# Altium PCB MFG01_04.PcbDoc
Units mm, origin at the board's own origin, x right, y up, seen from the top; angles counter-clockwise.
Board outline 80 x 50 mm, 2 copper layers (TopLayer, BottomLayer); 61 components, 44 nets, 259 pads, 60 vias.
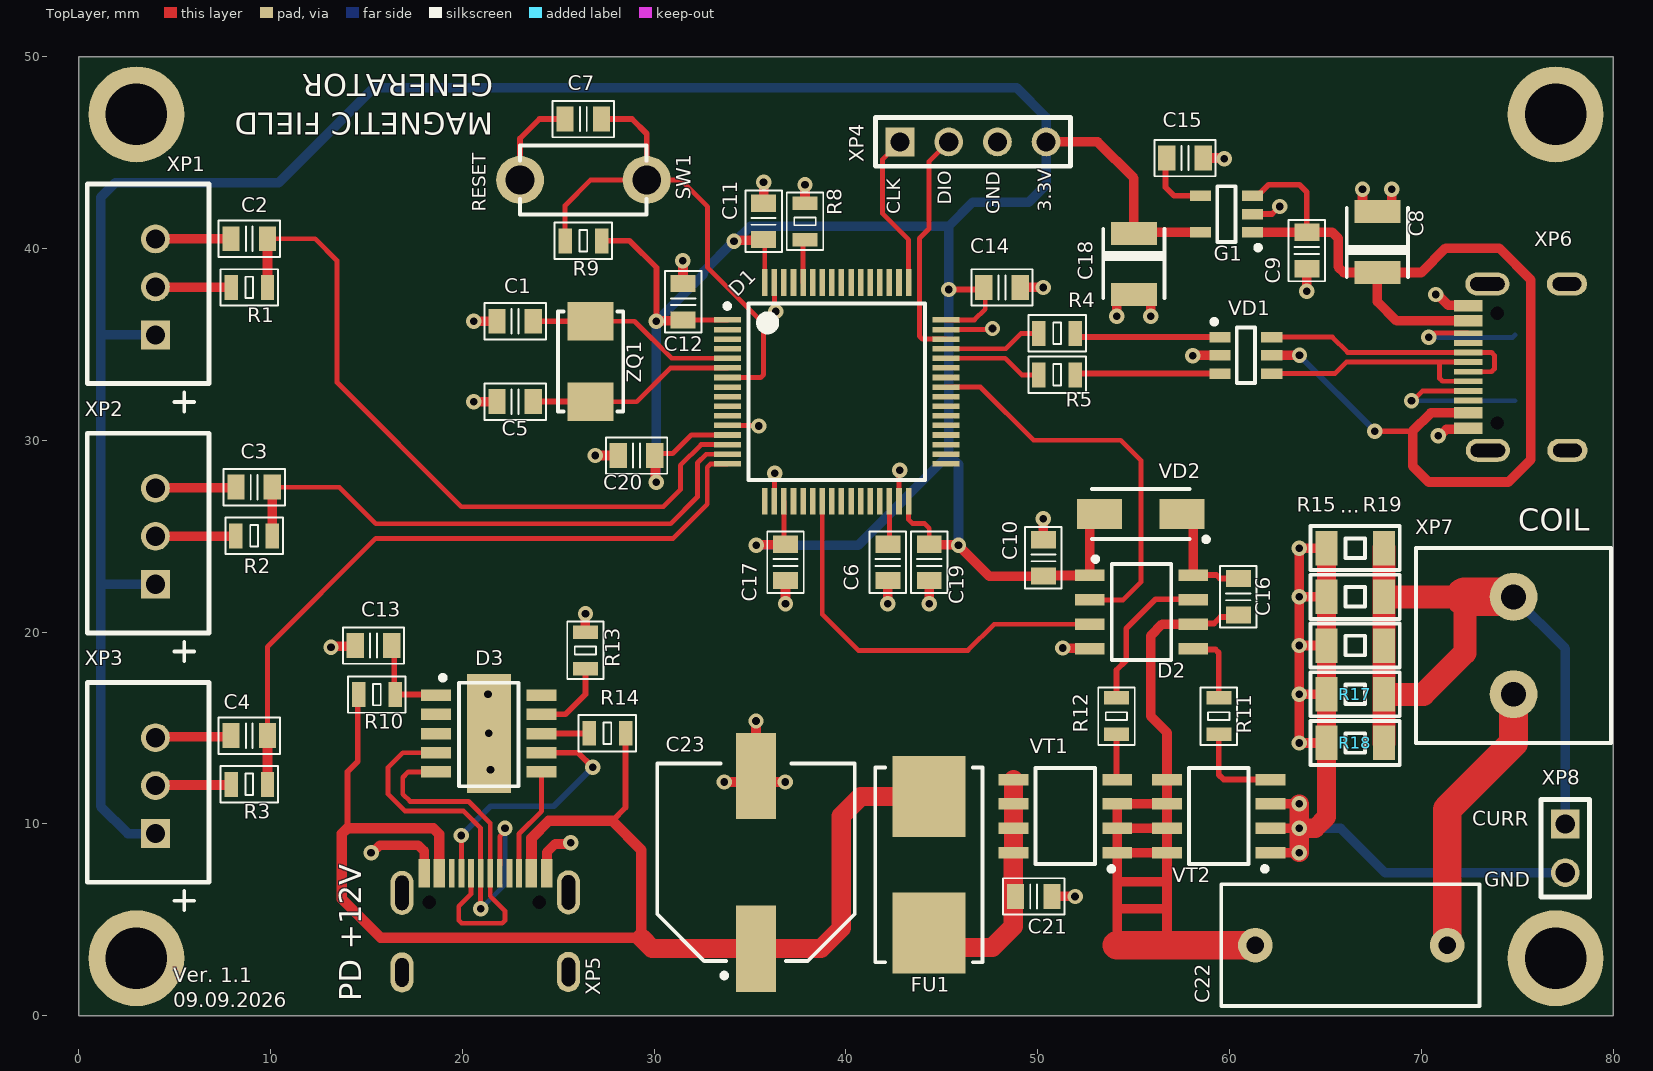
[diagram p0: TopLayer view]
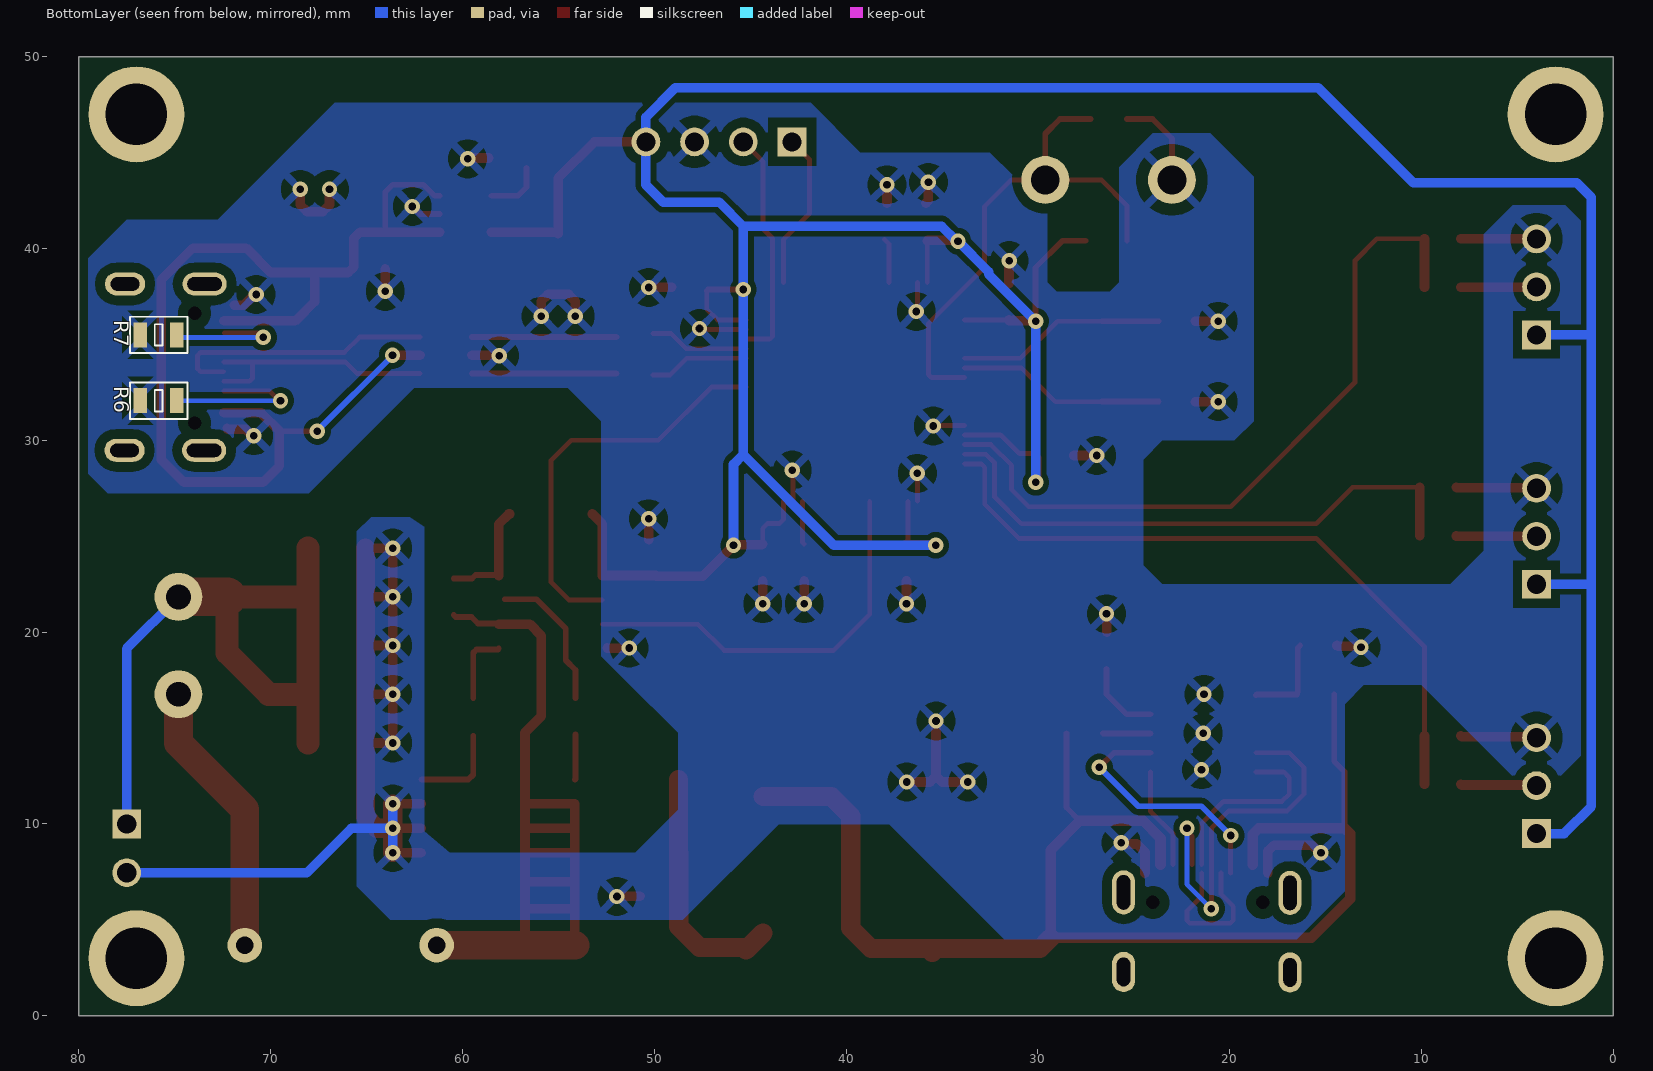
[diagram p1: BottomLayer view, seen from below]
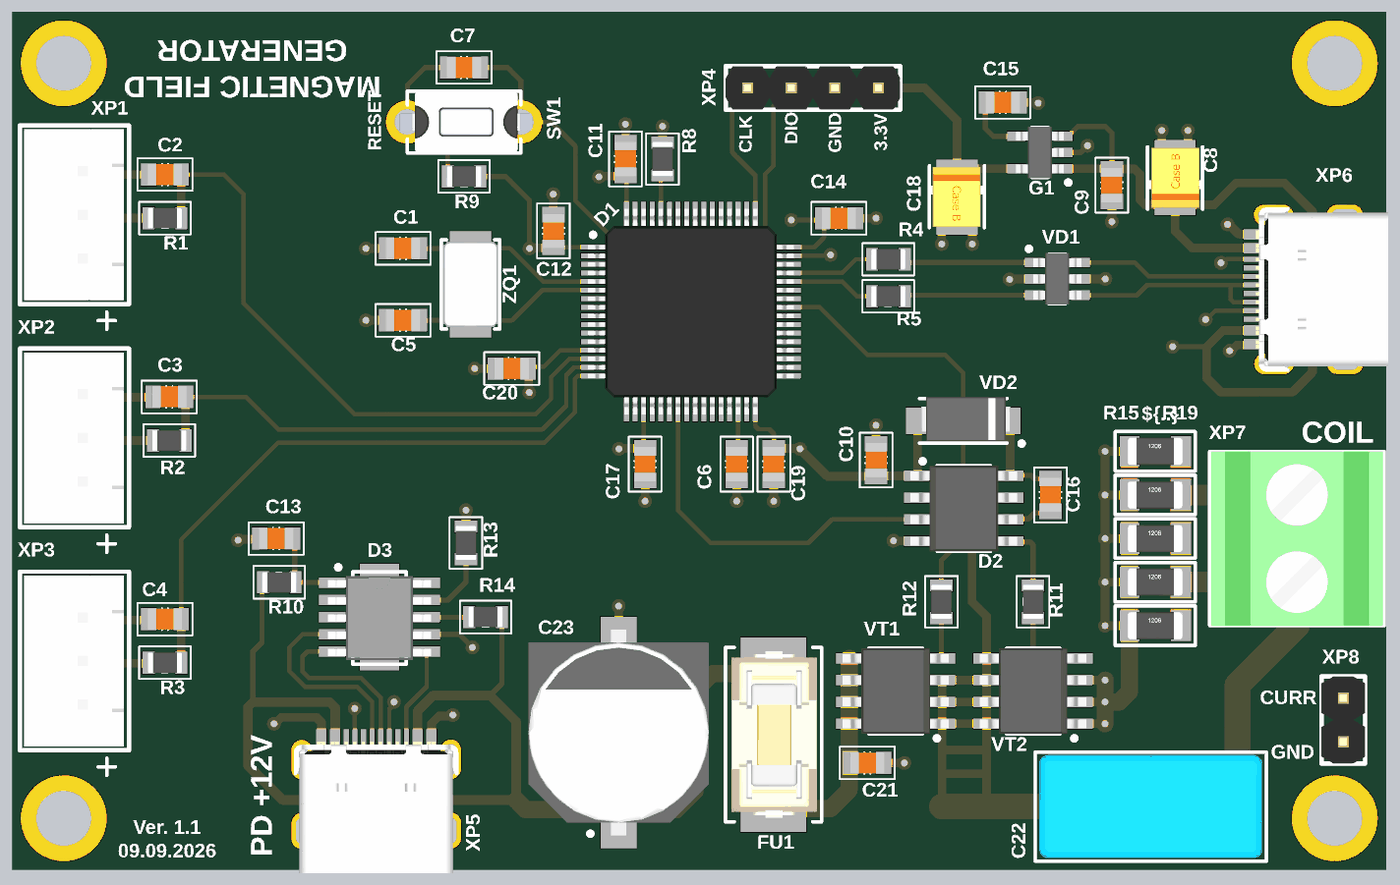
[diagram p2: 3D render of the assembled board from above, using the file's embedded part models]

## Layer stack, top to bottom
TopSolder: solder mask 0.0102, Solder Resist, Dk 3.5
TopLayer: signal copper 0.0356
Dielectric1: core 0.32, FR-4, Dk 4.8
BottomLayer: signal copper 0.0356
BottomSolder: solder mask 0.0102, Solder Resist, Dk 3.5

## Board outline
0,0 0,50 80,50 80,0

## Design rules (kind name [scope] priority, off if disabled: settings)
Clearance [All] p1: gap=0.2 ignorepadtopadclearanceinfootprint=FALSE except(0.254: Arc-Arc Arc-Track; 0.3: Arc-Poly Track-Poly SMDPad-Poly Via-Poly Fill-Poly Poly-Poly; 0.5: THPad-Fill THPad-Poly)
FabricationTestPointUsage TestPointUsage [All] p1: valid=0 allowmultiple=FALSE
FabricationTestpoint Testpoint [All] p1: side=3 testpointundercomponent=TRUE minsize=1.016 maxsize=2.54 preferedsize=1.524 minholesize=0.508 maxholesize=1.016 preferedholesize=0.813 testpointgrid=0.025 allowsidetop=TRUE allowsidebottom=TRUE usegrid=TRUE gridtolerance=0
PlaneClearance [All] p1: clearance=0.6
PlaneConnect [All] p1: planeconnectstyle=Relief reliefexpansion=0.4 reliefentries=4 reliefconductorwidth=0.4 reliefairgap=0.6
PolygonConnect [All] p1: connectstyle=Relief reliefconductorwidth=0.4 reliefentries=4 polygonreliefangle="45 Angle" airgapwidth=0.6
RoutingLayers NO_GND_TRACE [InNet('GND')] p1: top layer_v5=FALSE bottom layer_v5=FALSE
RoutingLayers [All] p2: top layer_v5=TRUE bottom layer_v5=TRUE
RoutingPriority RoutingPriority_3 [InNet('GND')] p1: routingpriority=1
RoutingPriority RoutingPriority_2 [InNet('VCC')] p2: routingpriority=1
RoutingPriority RoutingPriority_1 [InNet('-15V')] p3: routingpriority=1
RoutingPriority [InNet('+15V')] p4: routingpriority=1
RoutingVias [All] p1: holewidth=0.4 width=0.8 viastyle="Through Hole" minholewidth=0.4 minwidth=0.8 maxholewidth=0.4 maxwidth=0.8
SMDNeckDown [All] p1: percent=90.000
SilkToSolderMaskClearance SilkscreenOverComponentPads [IsPad] p1: minsilkscreentomaskgap=0.254 clearancetoexposedcopper=TRUE
SolderMaskExpansion [All] p1: expansion=0.051 istentingtop=FALSE
Width Width_4 [InNet('NetC21_1')] p1: maxlimit=1 minlimit=0.3 preferedwidth=0.8
Width Width_3 [InNet('NetR15_2')] p2: maxlimit=1.5 minlimit=0.5 preferedwidth=1
Width Width_2 [InNet('NetC22_2')] p3: maxlimit=2 minlimit=0.5 preferedwidth=1
Width Width_1 [InNet('NetC16_2')] p4: maxlimit=2 minlimit=0.3 preferedwidth=1
Width VP [InNet('12V')] p5: maxlimit=1 minlimit=0.3 preferedwidth=0.8
Width PEL2 [InNet('PEL2')] p6: maxlimit=1 minlimit=0.3 preferedwidth=0.8
Width PEL1 [InNet('PEL1')] p7: maxlimit=1 minlimit=0.3 preferedwidth=0.8
Width GND [InNet('GND')] p8: maxlimit=1 minlimit=0.254 preferedwidth=0.5
Width VCC [InNet('5V')] p9: maxlimit=0.8 minlimit=0.3 preferedwidth=0.8
Width [All] p10: maxlimit=0.5 minlimit=0.254 preferedwidth=0.3
23 further rules are at their usual default settings.

## Components (designator, comment, footprint, x,y, rotation, side; value= is the part's Value field where it differs from the comment)
... "?" R_1206 66.548,19.304 r0 top (schematic designator R16)
C1 "20pF" C_0805 22.749,36.212 r180 top
C2 "100" C_0805 8.89,40.513 r180 top
C3 "100" C_0805 9.144,27.559 r180 top
C4 "100" C_0805 8.89,14.605 r180 top
C5 "20pF" C_0805 22.749,32.021 r180 top
C6 "?" C_0805 42.18,23.639 r270 top
C7 "?" C_0805 26.305,46.753 r180 top
C8 "?" "Tantalum B" 67.707,38.752 r90 top
C9 "?" C_0805 64.024,39.895 r270 top
C10 "?" C_0805 50.292,23.876 r90 top
C11 "?" C_0805 35.703,41.419 r90 top
C12 "?" C_0805 31.512,37.228 r90 top
C13 "?" C_0805 15.367,19.304 r0 top
C14 "?" C_0805 48.133,37.973 r0 top
C15 "?" C_0805 57.674,44.721 r0 top
C16 "?" C_0805 60.452,21.844 r270 top
C17 "?" C_0805 36.846,23.639 r270 top
C18 "?" "Tantalum B" 55.007,40.784 r270 top
C19 "?" C_0805 44.339,23.639 r270 top
C20 "?" C_0805 29.083,29.21 r180 top
C21 "?" C_0805 49.784,6.223 r0 top
C22 "?" "FILM CAP 6mm" 61.341,3.683 r0 top
C23 "470uF" CAPAE1030X1020N 35.306,8.001 r90 top
D1 "STM32F411RET" LQFP64 39.513,32.529 r0 top
D2 "IR2101" SOIC8 55.405,21.051 r0 top
D3 "CH224K" SOIC10 21.38,14.725 r0 top
FU1 "?" "FUSE BLOCK 2410" 44.323,4.318 r90 top
G1 "LD3985" SOT95P280X100-5N 59.833,41.8 r180 top
R1 "82" R_0805 8.89,37.973 r0 top
R2 "82" R_0805 9.144,25.019 r0 top
R3 "82" R_0805 8.89,12.065 r0 top
R4 "22" R_0805 51.009,35.577 r180 top
R5 "22" R_0805 51.009,33.418 r180 top
R6 "5K1" R_0805 75.835,32.068 r0 bottom
R7 "5K1" R_0805 75.835,35.497 r180 bottom
R8 "10K" R_0805 37.862,41.419 r270 top
R9 "10K" R_0805 26.305,40.403 r180 top
R10 "10K" R_0805 15.543,16.75 r0 top
R11 "100" R_0805 59.436,15.621 r90 top
R12 "100" R_0805 54.102,15.621 r90 top
R13 "24K" R_0805 26.416,19.05 r270 top
R14 "10K" R_0805 27.559,14.732 r180 top
R15 "?" R_1206 66.548,21.844 r0 top
R17 "?" R_1206 66.548,16.764 r0 top
R18 "?" R_1206 66.548,14.224 r0 top
R19 "?" R_1206 66.548,24.384 r0 top
SW1 "Tact DTS32" "TACT DTS-32" 29.607,43.578 r180 top
VD1 "USBLC6-2SC6" SSOT-6 60.849,34.434 r0 top
VD2 "SS14" DO-214 55.372,26.162 r180 top
VT1 "IRF7470TR" SOIC8 51.435,10.414 r180 top
VT2 "IRF7470TR" SOIC8 59.436,10.414 r180 top
XP1 "XH3P" XH3P 4,35.5 r90 top
XP2 "XH3P" XH3P 4,22.5 r90 top
XP3 "XH3P" XH3P 4,9.5 r90 top
XP4 "PLS4" PLS-4 42.814,45.562 r0 top
XP5 "Type-C" TYPE-C 18.052,7.436 r0 top
XP6 "Type-C" TYPE-C 72.438,30.681 r90 top
XP7 "EK508_02" EK508_02 74.803,16.764 r90 top
XP8 "PLS2" PLS-2 77.5,10 r270 top
ZQ1 "NX5032" NX5032 26.686,32.012 r90 top

## Footprints (in the part's own frame and the unit in brackets; to place one, negate y for a bottom-side part, rotate by r counter-clockwise, add the part's x,y. Pads: shape width x height; smd on the part's side, far side on the other; paste and mask are expansions set on the pad)
C_0805 [mm] "Capacitor Pattern"
  rect 0.9x1.3 smd: 1(-0.95,0) 2(0.95,0)
  silkscreen extent -1.6,-0.95 1.6,0.95, body extent -1,-0.63 1,0.62, height 0.6
CAPAE1030X1020N [mm] "Capacitor, Aluminium Electrolytric, 10.3mm L X 10.3mm W X 10.2mm H, IPC Medium Density"
  rect 4.5x2.1 smd: 1(-4.5,0) 2(4.5,0)
  silkscreen extent -6.02,-5.15 5.15,5.15, body extent -6,-5.25 6,5.25, height 10.2
DO-214 [mm] "DO-214-AC/SMA Diode, Molded Body; 5.195mm L X 2.605mm W X 2.30mm H, IPC Medium Density"
  rect 2.35x1.55 smd: 1(-2.15,0) 2(2.15,0)
  silkscreen extent -3.53,-1.3 2.55,1.45, body extent -2.75,-1.4 2.45,1.2, height 2.3
EK508_02 [mm]
  round 2.5 hole 1.3: 1(0,0) 2(5.08,0)
  silkscreen extent -2.54,-5.08 7.62,5.08, body extent -2.54,-5 7.62,5, height 13.8
"FILM CAP 6mm" [mm] "Film Capacitor CBB"
  round 1.8 hole 0.9: 1(0,0) 2(10,0)
  silkscreen extent -1.78,-3.17 11.68,3.17, body extent -1.55,-3 11.45,3, height 12
"FUSE BLOCK 2410" [mm]
  rect 4.24x3.81 smd: 1(0,0) 2(7.112,0)
  silkscreen extent -1.52,-2.79 8.64,2.79, body extent -1.29,-2.54 8.41,2.46, height 3.74
LQFP64 [mm] "TSQFP, 64-Leads, Body 10,00x10,00mm, Pitch 0,50mm, IPC Medium Density"
  rect 1.4x0.29 smd: 1(-5.7,3.75) 2(-5.7,3.25) 3(-5.7,2.75) 4(-5.7,2.25) 5(-5.7,1.75) 6(-5.7,1.25) 7(-5.7,0.75) 8(-5.7,0.25) 9(-5.7,-0.25) 10(-5.7,-0.75) 11(-5.7,-1.25) 12(-5.7,-1.75) 13(-5.7,-2.25) 14(-5.7,-2.75) 15(-5.7,-3.25) 16(-5.7,-3.75) 33(5.7,-3.75) 34(5.7,-3.25) 35(5.7,-2.75) 36(5.7,-2.25) 37(5.7,-1.75) 38(5.7,-1.25) 39(5.7,-0.75) 40(5.7,-0.25) 41(5.7,0.25) 42(5.7,0.75) 43(5.7,1.25) 44(5.7,1.75) 45(5.7,2.25) 46(5.7,2.75) 47(5.7,3.25) 48(5.7,3.75)
  rect 0.29x1.4 smd: 17(-3.75,-5.7) 18(-3.25,-5.7) 19(-2.75,-5.7) 20(-2.25,-5.7) 21(-1.75,-5.7) 22(-1.25,-5.7) 23(-0.75,-5.7) 24(-0.25,-5.7) 25(0.25,-5.7) 26(0.75,-5.7) 27(1.25,-5.7) 28(1.75,-5.7) 29(2.25,-5.7) 30(2.75,-5.7) 31(3.25,-5.7) 32(3.75,-5.7) 49(3.75,5.7) 50(3.25,5.7) 51(2.75,5.7) 52(2.25,5.7) 53(1.75,5.7) 54(1.25,5.7) 55(0.75,5.7) 56(0.25,5.7) 57(-0.25,5.7) 58(-0.75,5.7) 59(-1.25,5.7) 60(-1.75,5.7) 61(-2.25,5.7) 62(-2.75,5.7) 63(-3.25,5.7) 64(-3.75,5.7)
  silkscreen extent -5.82,-4.6 4.6,4.6, body extent -6,-6 6,6, height 1.6
NX5032 [mm] "NX5032"
  rect 2x2.4 smd: 1(0,0) 2(4.2,0)
  silkscreen extent -0.5,-1.7 4.7,1.7, body extent -0.4,-1.6 4.6,1.6, height 1
PLS-2 [mm]
  rect 1.5x1.5 hole 1: 1(0,0)
  round 1.5 hole 1: 2(2.54,0)
  silkscreen extent -1.27,-1.27 3.81,1.27, body extent -1.27,-1.27 3.81,1.27, height 8.9
PLS-4 [mm]
  rect 1.5x1.5 hole 1: 1(0,0)
  round 1.5 hole 1: 2(2.54,0) 3(5.08,0) 4(7.62,0)
  silkscreen extent -1.27,-1.27 8.89,1.27, body extent -1.27,-1.27 8.89,1.27, height 8.9
R_0805 [mm] "Resistor Pattern"
  rect 0.7x1.3 smd: 1(-0.95,0) 2(0.95,0)
  silkscreen extent -1.5,-0.95 1.5,0.95, body extent -1,-0.6 1,0.6, height 0.5
R_1206 [mm]
  rect 1.15x1.8 smd: 1(-1.5,0) 2(1.5,0)
  silkscreen extent -2.32,-1.15 2.33,1.15, body extent -1.6,-0.8 1.6,0.8, height 1
SOIC8 [mm] "SOIC 8, Pitch 1.27mm - Body 4x5mm, IPC Medium Density"
  rect 1.55x0.6 smd: 1(-2.7,1.905) 2(-2.7,0.635) 3(-2.7,-0.635) 4(-2.7,-1.905) 5(2.7,-1.905) 6(2.7,-0.635) 7(2.7,0.635) 8(2.7,1.905)
  silkscreen extent -2.52,-2.5 1.55,2.88, body extent -3.1,-2.5 3.1,2.5, height 1.75
SOIC10 [mm] "SOIC 10, Pitch 1.27mm"
  rect 2.3x6.2 smd: 0(0,0)
  rect 1.55x0.6 smd: 1(-2.75,1.992) 2(-2.75,0.992) 3(-2.75,-0.008) 4(-2.75,-1.008) 5(-2.75,-2.008) 6(2.75,-2.008) 7(2.75,-1.008) 8(2.75,-0.008) 9(2.75,0.992) 10(2.75,1.992)
  silkscreen extent -2.52,-2.76 1.55,3.03, body extent -3,-2.51 3,2.39, height 1.75
SOT95P280X100-5N [mm] "SOT23, 0.95mm pitch; 5 pin, 1.625mm W X 2.9mm L, IPC Medium Density"
  rect 1.1x0.55 smd: 1(-1.35,0.95) 2(-1.35,0) 3(-1.35,-0.95) 4(1.35,-0.95) 5(1.35,0.95)
  silkscreen extent -1.78,-1.45 0.48,1.87, body extent -1.4,-1.5 1.4,1.5, height 1
SSOT-6 [mm] "SOT23, 0.95mm pitch; 6 pin, 1.625mm W X 2.90mm L X 1.00mm H body, IPC Medium Density"
  rect 1.1x0.55 smd: 1(-1.35,0.95) 2(-1.35,0) 3(-1.35,-0.95) 4(1.35,-0.95) 5(1.35,0) 6(1.35,0.95)
  silkscreen extent -1.77,-1.45 0.48,1.87, body extent -1.4,-1.5 1.4,1.5, height 1
"TACT DTS-32" [mm]
  round 2.5 hole 1.5: 1(0,0) 2(6.6,0)
  silkscreen extent 0,-1.8 6.6,1.8, body extent -0.7,-1.75 7.05,1.75, height 5.5
"Tantalum B" [mm]
  rect 1.2x2.4 smd: 1(0,0) 2(3.175,0)
  silkscreen extent -0.25,-1.6 3.37,1.62, body extent -0.17,-1.42 3.33,1.38, height 1.9
TYPE-C [mm] "TYPE-C"
  oval 1.2x2.1 hole 0.7 slot 1.5 at 90 deg: 0(-1.2,-5.175) 0(7.475,-5.15)
  oval 1.2x2.3 hole 0.7 slot 1.8 at 90 deg: 0(-1.2,-1.025) 0(7.475,-1)
  round 0.3 hole 0.7: 0(0.225,-1.525) 0(5.95,-1.525)
  rect 0.6x1.5 smd: 1(-0.05,0) 2(0.75,0) 11(5.55,0) 12(6.35,0)
  rect 0.3x1.5 smd: 3(1.4,0) 4(1.9,0) 5(2.4,0) 6(2.9,0) 7(3.4,0) 8(3.9,0) 9(4.4,0) 10(4.9,0)
  body extent -1.66,-7.68 7.92,0.03, height 3.25
XH3P [mm]
  rect 1.5x1.5 hole 1: 1(0,0)
  round 1.5 hole 1: 2(2.5,0) 3(5,0)
  silkscreen extent -2.54,-2.79 7.87,3.56, body extent -2.31,-2.5 7.65,3.3, height 7

## Part data
... R15 R17 R18 R19: library part "Resistor SMD 1206", "Resistor SMD 1206"
C1 C2 C3 C4 C5 C6 C7 C9 C10 C11 C12 C13 C14 C15 C16 C17 C19 C20 C21: library part "CAP 0805", "CAP 0805"
C8 C18: library part "Tantalum B", "Tantalum B"
C22: library part "FILM CAP 6mm", "Film capacitor"
C23: library part "El. Cap. D=10mm", "Aluminum Electrolytic Capacitor D=10mm"
D1: "Performance line, ARM-based 32-bit MCU"
D2: "Half-Bridge, not invert"
D3: "supports  PD3.0/2.0,  BC1.2  and  other  boost  fast  charging  protocols"
FU1: library part "FUSE SMD 2410", "FUSE 2410"
G1: "Ultra low drop and low noise BiCMOS voltage regulator"
R1 R2 R3 R4 R5 R6 R7 R8 R9 R10 R11 R12 R13 R14: library part "Resistor SMD 0805", "Resistor SMD 0805"
VD1: "Very low capacitance ESD protection"
VD2: "Schottky Barrier Rectifier"
VT1 VT2: "N-MOSFET 40В 10А 2.5Вт"
XP1 XP2 XP3: "PLS3"
ZQ1: "Resonator SMD"

## Free pads (board coordinates)
  round 5 hole 3.2 unplated: 0(3,3) 0(3,47) 0(77,3) 0(77,47)

## Via types
v1: diameter 0.8, hole 0.4, TopLayer to BottomLayer, tented both sides, 60 vias

## Nets (pads, with @x,y where several pads share a name; then routed paths per layer and width w, separated by ;. In a path a pad name is that pad's centre, name@x,y a point inside that pad or via, vN(x,y) a via of type N, cw(c..) or ccw(c..) an arc to the next point about the centre after c; other vN are vias at no path point)
3.3V: C10.1 C11.1 C12.1 C14.1 C17.1 C18.1 C19.1 C20.1 D1.1 D1.13 D1.19 D1.32 D1.48 D1.64 D2.1 G1.5 R9.1 VD2.2 XP1.1 XP2.1 XP3.1 XP4.4 | length 213.1
  TopLayer w0.254: C20.1 30.141,29.318 30.969,29.318 31.93,30.279 D1.13 ; C12.1@31.258,36.405 31.384,36.279 D1.1 ; D1.64 35.763,40.402 C11.1@35.83,40.469 ; D1.19 36.763,24.672 C17.1 ; D1.32 43.263,25.864 43.456,25.671 44.085,25.671 44.339,25.417 C19.1 ; D1.48 46.692,36.279 47.26,36.847 C14.1@47.26,37.802
  TopLayer w0.3: R9.1@27.509,40.403 28.718,40.403 30.115,39.006 v1(30.115,36.212) ; v1(45.355,37.863) 47.199,37.863 C14.1@47.26,37.802
  TopLayer w0.5: C20.1@30.047,29.083 30.066,29.064 30.066,27.846 v1(30.099,27.813) ; v1(30.115,36.212) 30.148,36.245 31.479,36.245 C12.1 ; v1(34.163,40.386) 34.204,40.427 35.738,40.427 C11.1@35.763,40.402 ; v1(35.322,24.528) 35.353,24.559 36.816,24.559 C17.1 ; C19.1 44.37,24.559 45.833,24.559 v1(45.863,24.528) 47.465,22.926 C10.1@49.911,22.926 ; C10.1@49.911,22.956 D2.1 52.705,25.645 VD2.2 ; XP4.4 53.117,45.562 55.007,43.672 C18.1 55.073,40.85 G1.5
  BottomLayer w0.5: XP3.1 2.565,9.5 1.143,10.922 1.143,22.606 ; XP2.1 1.249,22.5 1.143,22.606 ; XP1.1 1.203,35.5 1.143,35.56 ; v1(30.099,27.813) 30.107,27.821 30.107,36.204 v1(30.115,36.212) 32.557,38.654 32.557,38.78 v1(34.163,40.386) 34.231,40.386 35.01,41.165 45.355,41.165 ; v1(35.322,24.528) 40.629,24.528 45.355,29.254 ; v1(45.863,24.528) 45.863,28.746 45.355,29.254 ; 1.143,22.606 1.143,35.56 ; 1.143,35.56 1.143,42.672 1.905,43.434 10.434,43.434 15.387,48.387 48.895,48.387 50.434,46.848 XP4.4 50.434,43.322 49.53,42.418 46.608,42.418 45.355,41.165 ; 45.355,29.254 v1(45.355,37.863) 45.355,41.165
12V: C23.1 FU1.2 R10.1 R14.1 XP5.2 XP5.11 | length 73.7
  TopLayer w0.3: 14.009,9.779 14.009,12.728 14.544,13.263 R10.1@14.544,16.765 ; 27.813,10.161 28.509,10.857 R14.1
  TopLayer w0.55: XP5.2@18.803,7.876 18.803,9.457 18.481,9.779 14.009,9.779 13.716,9.486 13.716,6.097 15.749,4.064 29.337,4.064 29.337,8.637 27.813,10.161 24.511,10.161 23.603,9.253 XP5.11@23.603,7.876
  TopLayer w1: 29.337,4.064 29.9,3.501 C23.1 ; C23.1@35.505,3.302 C23.1 ; FU1.2 40.767,11.43 39.751,10.414 39.751,4.572 38.68,3.501 C23.1
ADC1: C2.1 D1.14 R1.2 | length 38.1
  TopLayer w0.254: C2.1 12.319,40.513 13.462,39.37 13.462,33.02 19.939,26.543 30.48,26.543 31.369,27.432 31.369,28.702 32.446,29.779 D1.14
  TopLayer w0.5: R1.2 C2.1
ADC2: C3.1 D1.15 R2.2 | length 29.6
  TopLayer w0.254: C3.1 13.589,27.559 15.494,25.654 30.861,25.654 32.258,27.051 32.258,28.829 32.708,29.279 D1.15
  TopLayer w0.5: R2.2 C3.1
ADC3: C4.1 D1.16 R3.2 | length 36.2
  TopLayer w0.254: C4.1@9.84,14.644 9.84,19.238 15.494,24.892 30.988,24.892 32.766,26.67 32.766,28.602 32.94,28.776 33.81,28.776 D1.16
  TopLayer w0.5: R3.2 C4.1
BOOT0: D1.60 R8.2 | length 2.3
  TopLayer w0.254: D1.60 37.763,40.246 37.986,40.469 R8.2@37.989,40.469
CC1: D3.7 XP5.4 | length 13.3
  TopLayer w0.254: v1(19.939,9.398) 19.945,9.392 19.945,7.442 XP5.4
  TopLayer w0.3: D3.7 26.035,13.717 v1(26.797,12.955)
  BottomLayer w0.3: v1(19.939,9.398) 21.463,10.922 24.764,10.922 v1(26.797,12.955)
CC2: D3.6 XP5.10 | length 5.3
  TopLayer w0.254: XP5.10@22.953,7.876 22.953,9.492 24.13,10.669 D3.6
GND: ....1 C1.2 C2.2 C3.2 C4.2 C5.2 C6.2 C7.2 C8.2 C9.2 C10.2 C11.2 C12.2 C13.1 C14.2 C15.2 C17.2 C18.2 C19.2 C20.2 C21.2 C23.2 D1.12 D1.18 D1.31 D1.47 D1.63 D2.4 D3.0 G1.2 R6.2 R7.1 R8.1 R13.1 R15.1 R17.1 R18.1 R19.1 SW1.2 VD1.2 VT2.1 VT2.2 VT2.3 XP1.3 XP2.3 XP3.3 XP4.3 XP5.1 XP5.12 XP6.1 XP6.12 XP8.2 | length 129
  TopLayer w0.254: D1.12 35.421,30.779 v1(35.449,30.751) ; D1.18 36.263,28.263 v1(36.281,28.281) ; D1.63 36.263,36.795 v1(36.338,36.72) ; D1.31 42.763,28.412 v1(42.799,28.448) ; D1.47 47.589,35.779 v1(47.641,35.831)
  TopLayer w0.3: SW1.2 23.007,45.741 24.019,46.753 C7.2 ; G1.2 62.214,41.8 v1(62.611,42.197)
  TopLayer w0.5: XP3.3 4.053,14.553 7.888,14.553 C4.2 ; XP2.3 4.029,27.53 8.164,27.53 C3.2 ; XP1.3 4.006,40.507 7.933,40.507 C2.2 ; v1@13.196,19.258 14.37,19.258 C13.1 ; v1(15.24,8.509) 15.302,8.509 15.683,8.89 17.709,8.89 18.002,8.597 XP5.1 ; v1(20.59,32.021) C5.2 ; v1(20.59,36.212) C1.2 ; XP5.12 24.412,7.446 24.412,8.537 24.835,8.96 25.597,8.96 v1(25.654,9.017) ; R13.1 v1(26.416,20.955) ; v1(26.924,29.21) C20.2 ; v1(31.496,39.37) 31.504,39.362 31.504,38.186 C12.2 ; v1(33.655,12.192) 34.997,12.192 C23.2 ; v1(35.306,15.367) C23.2 ; v1(35.703,43.451) 35.703,42.496 C11.2@35.83,42.369 ; v1(36.83,12.192) 35.615,12.192 C23.2 ; v1(36.846,21.48) C17.2 ; R8.1 v1(37.862,43.324) ; v1(42.18,21.48) C6.2 ; v1(44.339,21.48) C19.2 ; C14.2 v1(50.292,37.973) ; C10.2 v1(50.292,25.908) ; C21.2 v1(51.943,6.223) ; v1(51.308,19.177) 51.323,19.162 52.429,19.162 D2.4@52.444,19.177 ; v1(54.118,36.466) 54.118,37.259 54.468,37.609 55.546,37.609 55.896,37.259 v1(55.896,36.466) ; v1@58.042,34.379 v1(58.069,34.407) 58.097,34.434 VD1.2 ; C15.2 59.685,44.721 v1@59.769,44.637 ; VT2.1 v1(63.627,8.509) ; VT2.2 v1(63.627,9.779) ; VT2.3 v1(63.627,11.049) ; v1@64.008,37.752 v1(64.024,37.768) C9.2 ; R18.1 v1(63.627,14.224) v1(63.627,16.764) ; R17.1 v1(63.627,16.764) ; ....1 v1(63.627,19.304) ; R15.1 v1(63.627,21.844) ; R19.1 v1(63.627,24.384) v1(63.627,21.844) ; v1(66.929,43.086) 66.929,42.277 67.279,41.927 68.103,41.927 68.453,42.277 v1(68.453,43.086) ; v1(70.755,37.609) 70.836,37.609 71.405,37.04 XP6.12@71.897,37.04 ; v1(70.882,30.243) 70.963,30.243 71.301,30.581 72.22,30.581 XP6.1@72.263,30.624 ; v1(63.627,16.764) v1(63.627,19.304) ; v1(63.627,19.304) v1(63.627,21.844)
  TopLayer w1: v1(63.627,8.509) v1(63.627,9.779) ; v1(63.627,11.049) v1(63.627,9.779) ; R19.1 R15.1 ....1 R17.1 R18.1 65.048,10.365 64.462,9.779 v1(63.627,9.779)
  BottomLayer w0.5: v1(63.627,8.509) v1(63.627,9.779) ; v1(63.627,11.049) v1(63.627,9.779) ; XP8.2 68.105,7.46 65.786,9.779 v1(63.627,9.779)
  other v1: 21.463,12.827 21.38,14.725 21.336,16.764 13.15,19.211 59.727,44.679
Hin: D1.41 D2.2 | length 21.1
  TopLayer w0.254: D1.41 47.01,32.779 49.784,30.005 54.323,30.005 55.372,28.956 55.372,22.606 54.452,21.686 D2.2
Lin: D1.23 D2.3 | length 21.2
  TopLayer w0.254: D1.23 38.763,20.927 40.64,19.05 46.355,19.05 47.721,20.416 D2.3
NetC6_1: C6.1 D1.30 | length 2.3
  TopLayer w0.254: C6.1 42.263,24.672 D1.30
NetC13_2: C13.2 D3.1 R10.2 | length 4.6
  TopLayer w0.3: C13.2 16.444,19.177 R10.2@16.444,16.891 ; R10.2 18.597,16.75 D3.1
NetC15_1: C15.1 G1.4 | length 3
  TopLayer w0.3: C15.1@56.658,44.213 56.658,43.197 57.105,42.75 G1.4
NetC16_1: C16.1 D2.8 VD2.1 | length 5.9
  TopLayer w0.3: D2.8@58.105,22.987 59.309,22.987 59.502,22.794 C16.1
  TopLayer w0.5: VD2.1 57.58,26.162 58.105,25.637 D2.8
NetC16_2: C16.2 C22.1 D2.6 VT1.1 VT1.2 VT1.3 VT2.5 VT2.6 VT2.7 VT2.8 | length 49.1
  TopLayer w0.3: D2.6@58.072,20.447 59.182,20.447 59.528,20.793 60.351,20.793 C16.2
  TopLayer w0.5: 54.135,3.683 54.135,5.588 ; 56.736,3.683 56.736,5.588 ; D2.6 56.484,20.416 55.88,19.812 55.88,15.621 56.736,14.765 VT2.5 VT2.6 ; 54.135,5.588 54.135,6.985 ; 54.135,5.588 56.736,5.588 ; 54.135,6.985 VT1.1 ; 54.135,6.985 56.736,6.985 ; VT1.1 VT1.2 ; VT1.1 VT2.8 ; VT1.2 VT1.3 VT2.6 ; VT1.2 VT2.7 ; 56.736,5.588 56.736,6.985 ; 56.736,6.985 VT2.8 ; VT2.8 VT2.7 ; VT2.7 VT2.6
  TopLayer w1.5: 54.135,3.683 56.736,3.683 C22.1
NetC21_1: C21.1 FU1.1 VT1.5 VT1.6 VT1.7 VT1.8 | length 12.9
  TopLayer w1: FU1.1 45.212,3.429 45.339,3.556 47.625,3.556 48.721,4.652 48.721,6.237 48.721,8.495 VT1.8 VT1.7 VT1.6 VT1.5
NetC22_2: C22.2 XP7.1 | length 14.5
  TopLayer w1.5: C22.2 71.341,10.762 74.803,14.224 XP7.1
NetD2_5: D2.5 R11.2 | length 3.8
  TopLayer w0.3: D2.5 58.149,19.102 59.26,19.102 59.436,18.927 R11.2
NetD2_7: D2.7 R12.2 | length 7.6
  TopLayer w0.3: R12.2 54.102,18.034 54.61,18.542 54.61,20.193 56.134,21.717 D2.7@57.788,21.717
NetD3_8: D3.8 R14.2 | length 2.5
  TopLayer w0.3: D3.8 26.594,14.717 R14.2
NetD3_9: D3.9 R13.2 | length 4.1
  TopLayer w0.3: D3.9 25.369,15.717 26.416,16.764 R13.2
NetR1_1: R1.1 XP1.2 | length 4
  TopLayer w0.5: XP1.2 4.013,37.987 7.926,37.987 R1.1
NetR2_1: R2.1 XP2.2 | length 4.2
  TopLayer w0.5: XP2.2 4.009,25.01 8.184,25.01 R2.1
NetR3_1: R3.1 XP3.2 | length 4
  TopLayer w0.5: XP3.2 4.033,12.033 7.908,12.033 R3.1
NetR4_1: R4.1 VD1.1 | length 7.5
  TopLayer w0.3: R4.1@51.959,35.384 VD1.1
NetR5_1: R5.1 VD1.3 | length 7.5
  TopLayer w0.3: R5.1@51.959,33.484 VD1.3
NetR6_1: R6.1 XP6.4 | length 8.6
  TopLayer w0.254: v1(69.485,32.068) 69.546,32.068 70.059,32.581 XP6.4
  BottomLayer w0.254: v1(69.485,32.068) R6.1
NetR7_2: R7.2 XP6.10 | length 6.3
  TopLayer w0.254: v1@70.688,35.59 XP6.10@72.406,35.59
  BottomLayer w0.254: v1(70.374,35.37) 74.758,35.37 R7.2
NetR11_1: R11.1 VT2.4 | length 4.8
  TopLayer w0.3: R11.1@59.436,14.605 59.436,12.573 59.69,12.319 VT2.4
NetR12_1: R12.1 VT1.4 | length 2.4
  TopLayer w0.3: R12.1 54.102,12.352 VT1.4
NetR15_2: ....2 R15.2 R17.2 R18.2 R19.2 XP7.2 XP8.1 | length 37.8
  TopLayer w1.2: R18.2 R17.2 ; R15.2 R19.2 ; R17.2 ....2 68.048,21.693 68.199,21.844 72.263,21.844 72.263,18.923 70.104,16.764 R17.2
  TopLayer w2: 72.263,21.844 XP7.2
  BottomLayer w0.5: XP7.2 77.5,19.147 XP8.1
OSC_IN: C1.1 D1.5 ZQ1.2 | length 10.9
  TopLayer w0.254: ZQ1.2 28.972,36.212 30.905,34.279 D1.5
  TopLayer w0.3: C1.1 ZQ1.2
OSC_OUT: C5.1 D1.6 ZQ1.1 | length 10.8
  TopLayer w0.254: ZQ1.1 29.09,32.012 30.857,33.779 D1.6
  TopLayer w0.3: C5.1 26.677,32.021 ZQ1.1
RST: C7.1 D1.7 R9.2 SW1.1 | length 27.4
  TopLayer w0.254: R9.2 25.355,42.247 26.686,43.578 SW1.1 31.385,43.578 32.782,42.181 32.782,39.006 35.703,36.085 35.703,33.428 35.554,33.279 D1.7
  TopLayer w0.3: C7.1 28.845,46.753 29.607,45.991 SW1.1
SWCLK: D1.49 XP4.1 | length 8.3
  TopLayer w0.254: XP4.1 41.91,44.658 41.91,41.816 43.263,40.463 D1.49
SWDIO: D1.46 XP4.2 | length 12.2
  TopLayer w0.254: D1.46 43.98,35.279 43.831,35.428 43.831,40.529 44.323,41.021 44.323,44.531 XP4.2
USB_5V: C8.1 C9.1 G1.1 G1.3 VD1.5 XP6.2 XP6.11 | length 60
  TopLayer w0.3: G1.3 61.458,42.75 62.032,43.324 63.643,43.324 64.024,42.943 64.024,40.85 C9.1 ; v1(67.564,30.48) 69.539,30.48
  TopLayer w0.5: G1.1 C9.1@64.024,40.85 ; VD1.5 v1(63.643,34.434) ; C9.1 65.36,40.845 65.659,40.546 65.659,39.045 65.952,38.752 C8.1 ; 69.539,30.48 69.539,28.665 70.374,27.83 74.533,27.83 75.708,29.005 75.708,38.371 74.057,40.022 71.263,40.022 69.993,38.752 C8.1 ; 69.539,30.481 70.489,31.431 XP6.2 ; XP6.11 68.704,36.231 67.707,37.228 C8.1
  BottomLayer w0.3: v1(63.643,34.434) 63.643,34.418 67.564,30.497 v1(67.564,30.48)
USB_DM: D1.44 R5.2 | length 5.2
  TopLayer w0.254: D1.44 48.304,34.279 49.165,33.418 R5.2
USB_DM_CONN: VD1.4 XP6.5 XP6.7 | length 12.9
  TopLayer w0.254: VD1.4 65.487,33.484 66.084,34.081 71.037,34.081 ; XP6.5 71.097,33.081 70.949,33.23 70.949,33.993 71.037,34.081 ; XP6.7 71.037,34.081
USB_DM_CONN1: D3.5 XP5.5 XP5.7 | length 18.1
  TopLayer w0.254: D3.5 17.183,12.717 16.891,12.425 16.891,11.558 17.272,11.177 20.32,11.177 21.453,10.044 XP5.7@21.453,7.876 ; XP5.5 20.452,6.355 19.812,5.715 19.812,4.975 19.961,4.826 22.076,4.826 22.225,4.975 22.225,5.461 21.453,6.233 XP5.7 XP5.7
USB_DP: D1.45 R4.2 | length 5.2
  TopLayer w0.254: D1.45 48.335,34.779 49.133,35.577 R4.2
USB_DP_CONN: VD1.6 XP6.6 XP6.8 | length 14.1
  TopLayer w0.254: VD1.6 65.36,35.384 66.154,34.59 72.438,34.59 73.654,34.59 73.803,34.441 73.803,33.73 73.654,33.581 XP6.6
USB_DP_CONN1: D3.4 XP5.6 XP5.8 | length 20.7
  TopLayer w0.254: D3.4 16.891,13.717 16.129,12.955 16.129,11.558 17.018,10.669 20.066,10.669 20.953,9.782 XP5.6@20.953,7.876 ; XP5.6@20.954,7.875 v1(20.955,5.588) v1(20.955,5.588) ; XP5.8@21.953,7.876 21.953,9.36 22.225,9.632 v1(22.225,9.78)
  BottomLayer w0.254: v1(20.955,5.588) 22.225,6.858 v1(22.225,9.78)
pads on no net: D1.2 D1.3 D1.4 D1.8 D1.9 D1.10 D1.11 D1.17 D1.20 D1.21 D1.22 D1.24 D1.25 D1.26 D1.27 D1.28 D1.29 D1.33 D1.34 D1.35 D1.36 D1.37 D1.38 D1.39 D1.40 D1.42 D1.43 D1.50 D1.51 D1.52 D1.53 D1.54 D1.55 D1.56 D1.57 D1.58 D1.59 D1.61 D1.62 D3.2 D3.3 D3.10 XP5.0 XP5.3 XP5.9 XP6.0 XP6.3 XP6.9

## Polygon pours and split planes (outlines as drawn)
GND on BottomLayer "NONET_L02_P-001" (solid, pour order 0): 41.847,47.597 39.25,45 32.5,45 29.5,42 29.5,38.25 29,37.75 26.25,37.75 25.75,38.25 25.75,44.25 24,46 21,46 18.75,43.75 18.75,31 19.75,30 23.5,30 24.5,29 24.5,23.5 23.5,22.5 18.75,22.5 17.75,22.5 8.5,22.5 6.75,24.25 6.75,40.75 5.25,42.25 2.5,42.25 1.25,41 1.25,30 1.25,14 2.75,12.5 5.25,12.5 10,17.25 13,17.25 14,16.25 14,6.5 16.5,4 31.75,4 37.75,10 43.5,10 48.5,5 63.75,5 65.5,6.75 65.5,25.25 64.75,26 62.75,26 62,25.5 62,9.635 60.659,8.5 51,8.5 48.75,10.75 48.75,14.75 51.5,17.5 52.75,18.75 52.75,31 54.5,32.75 62.5,32.75 68,27.25 78.5,27.25 79.5,28.25 79.5,39.5 77.5,41.5 72.75,41.5 66.653,47.597

## Silkscreen, mask and mechanical layers (free items; w line width, h text height)
TopOverlay:
  lines w0.2: 5,6 6,6 ; 5,19 6,19 ; 5,32 6,32 ; 5.5,5.5 5.5,6.5 ; 5.5,18.5 5.5,19.5 ; 5.5,31.5 5.5,32.5
  text "MAGNETIC FIELD / GENERATOR" at 21.605,49.47 h2 r180
  text "DIO" at 45.72,42.291 h1.2 r90
  text "RESET" at 21.463,41.91 h1.2 r90
  text "3.3V" at 50.927,41.91 h1.2 r90
  text "CLK" at 43.053,41.783 h1.2 r90
  text "GND" at 48.26,41.783 h1.2 r90
  text "COIL" at 75.057,24.892 h2
  text "CURR" at 72.644,9.652 h1.3
  text "GND" at 73.279,6.477 h1.3
  text "PD +12V" at 15.113,0.762 h2 r90
  text "Ver. 1.1 / 09.09.2026" at 4.938,0.182 h1.3
Board_outline:
  the board outline again, w0.5
Mechanical4:
  lines w0.2: -4,25 84,25